# Altium PCB MiniPC.PcbDoc (part 3 of 24)
Units mm, origin at the board's own origin, x right, y up, seen from the top; angles counter-clockwise.
Board outline 175 x 155 mm, 16 copper layers (1_Top, 2_int1_(gnd), 3_int2_(power), 4_int3_(gnd), 5_int4_(sign), 6_int5_(power), 7_int6_(sign), 8_int7_(power), 9_int8_(gnd), 10_int9_(sign), 11_int10_(gnd), 12_int11_(sign), 13_int12_(gnd), 14_int13_(power), 15_int14_(gnd), 16_Bottom), stack 2.008 mm thick; 1046 components, 837 nets, 6010 pads, 4009 vias.
Unrouted connection lines stored in the file: 564.
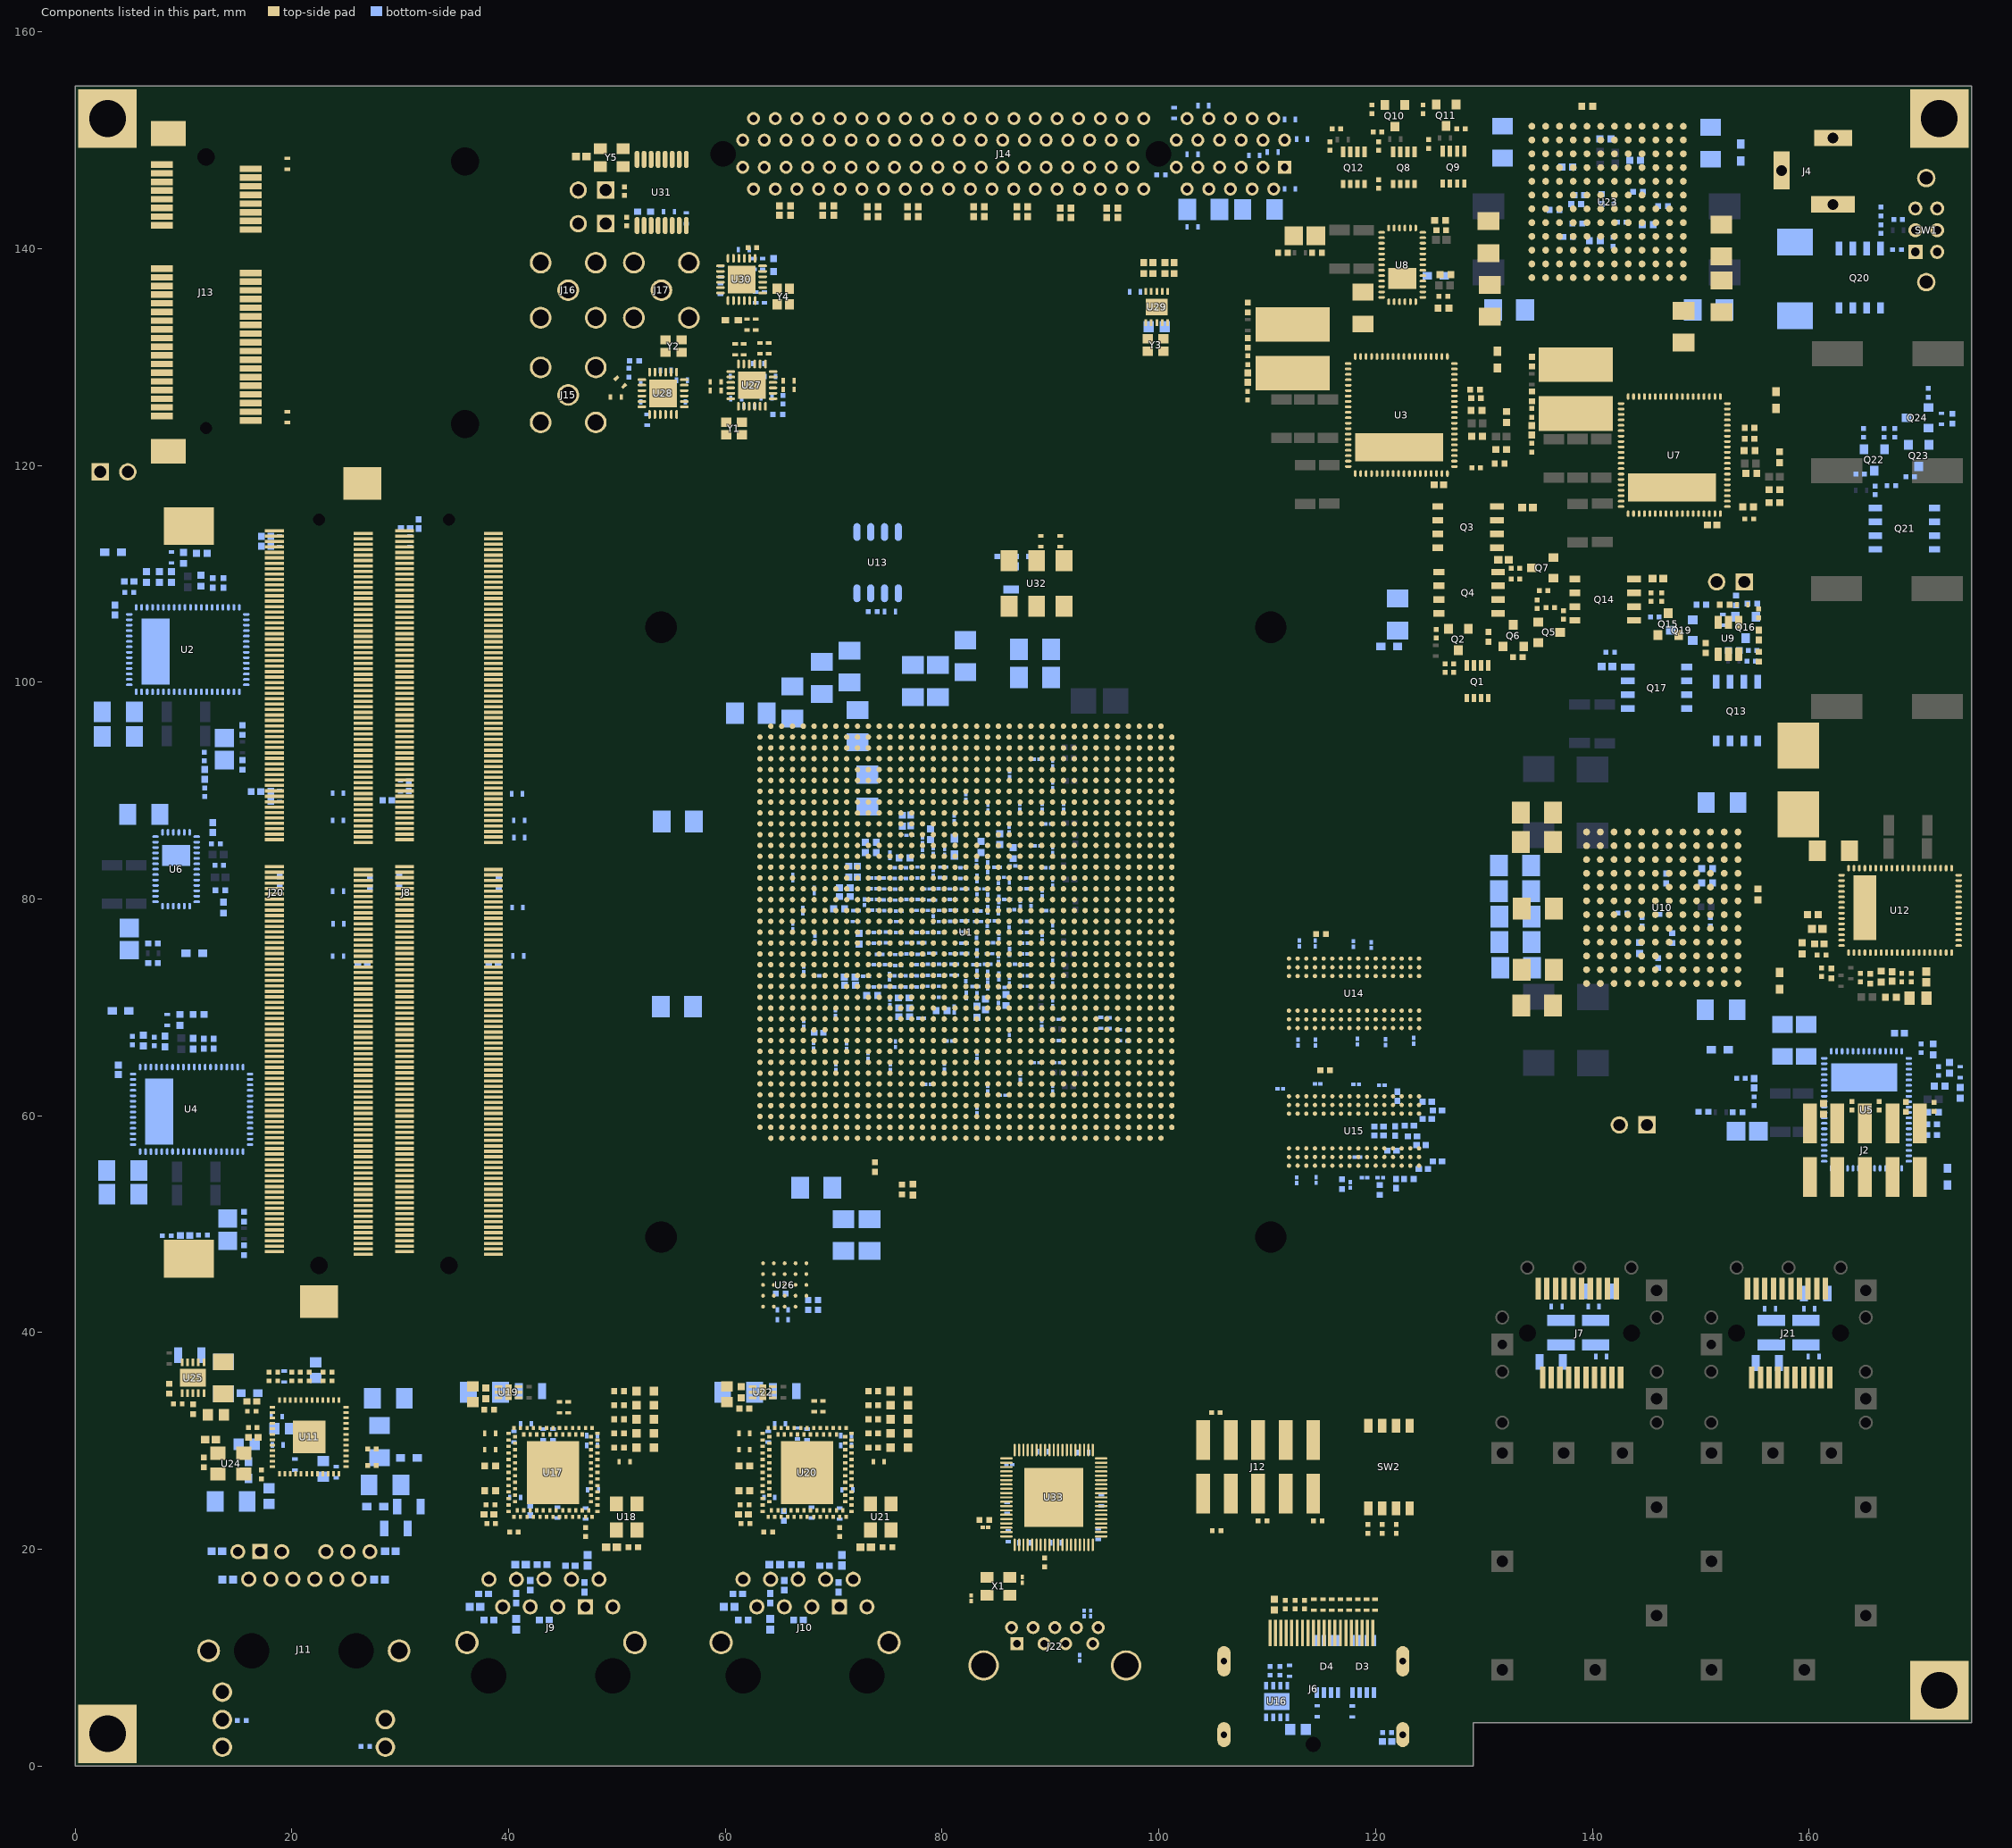
[diagram p17: the components of this part, seen from the top]

## Components (designator, comment, footprint, x,y, rotation, side; value= is the part's Value field where it differs from the comment) (continued)
C491 "GRM155R61A224KE19D" CAPC1005X55X25NL05T10 82.9,143.4 r90 top
C492 "GRM155R61A224KE19D" CAPC1005X55X25NL05T10 77.8,143.4 r90 top
C493 "GRM155R61A224KE19D" CAPC1005X55X25NL05T10 76.8,143.4 r90 top
C494 "GRM155R61A224KE19D" CAPC1005X55X25NL05T10 74.1,143.4 r90 top
C495 "GRM155R61A224KE19D" CAPC1005X55X25NL05T10 73.1,143.4 r90 top
C496 "GRM155R61A224KE19D" CAPC1005X55X25NL05T10 70,143.5 r90 top
C497 "GRM155R61A224KE19D" CAPC1005X55X25NL05T10 69,143.5 r90 top
C498 "GRM155R61A224KE19D" CAPC1005X55X25NL05T10 66,143.5 r90 top
C499 "GRM155R61A224KE19D" CAPC1005X55X25NL05T10 65,143.5 r90 top
C500 "GRM31CR61E226KE15L" CAPC3216X180X55ML20T25 109.2,143.6 r0 bottom locked
C501 "C1005X7R1E104M" CAPC1005X55X10LL05 108.8,148.6 r0 bottom locked
C502 "C1005X7R1E104M" CAPC1005X55X10LL05 110.5,148.9 r180 bottom locked
C503 "C1005X7R1E104M" CAPC1005X55X10LL05 113.2,150.1 r180 bottom locked
C504 "C1005X7R1E104M" CAPC1005X55X10LL05 112.1,145.5 r180 bottom locked
C505 "C1005X7R1E104M" CAPC1005X55X10LL05 112.1,151.9 r180 bottom locked
C506 "C1005X7R1E104M" CAPC1005X55X10LL05 104.1,153.2 r0 bottom locked
C507 "C1005X7R1E104M" CAPC1005X55X10LL05 103.1,148.7 r0 bottom locked
C508 "C1005X7R1E104M" CAPC1005X55X10LL05 103.1,142 r180 bottom locked
C509 "GRM31CR60J107ME39L" CAPC3216X190X55ML30T25 104.1,143.6 r180 bottom locked
C510 "C1005X7R1E104M" CAPC1005X55X10LL05 64.15,128.2 r180 bottom locked
C511 "C1005X7R1E104M" CAPC1005X55X10LL05 63.8,126.25 r180 bottom locked
C512 "C1005X7R1E104M" CAPC1005X55X10LL05 63.05,129.4 r0 bottom locked
C513 "C1005X7R1E104M" CAPC1005X55X10LL05 60.95,128.2 r0 bottom locked
C514 "C1005X7R1E104M" CAPC1005X55X10LL05 61,126.15 r0 bottom locked
C515 "C1005X7R1E104M" CAPC1005X55X10LL05 62.2,125.45 r180 bottom locked
C516 "C1005X7R1E104M" CAPC1005X55X10LL05 59.1,126.9 r180 top
C517 "C1005X7R1E104M" CAPC1005X55X10LL05 59.1,127.7 r180 top
C518 "C1005X7R1E104M" CAPC1005X55X10LL05 60.9,130.7 r90 top
C519 "C1005X7R1E104M" CAPC1005X55X10LL05 61.7,130.7 r90 top
C520 "C1005X7R1E104M" CAPC1005X55X10LL05 63.2,130.8 r90 top
C521 "C1005X7R1E104M" CAPC1005X55X10LL05 64,130.8 r90 top
C522 "C1005X7R1E104M" CAPC1005X55X10LL05 65.85,127.8 r0 top
C523 "C1005X7R1E104M" CAPC1005X55X10LL05 65.85,127 r0 top
C524 "C1005X7R1E104M" CAPC1005X55X10LL05 49.9,126.3 r180 top
C525 "C1005X7R1E104M" CAPC1005X55X10LL05 52.8,124.2 r270 bottom locked
C526 "C1005X7R1E104M" CAPC1005X55X10LL05 55.8,125.85 r180 bottom locked
C527 "C1005X7R1E104M" CAPC1005X55X10LL05 56,127.85 r180 bottom locked
C528 "C1005X7R1E104M" CAPC1005X55X10LL05 54.5,128.75 r0 bottom locked
C529 "C1005X7R1E104M" CAPC1005X55X10LL05 52.7,127.55 r0 bottom locked
C530 "C1005X7R1E104M" CAPC1005X55X10LL05 52.7,125.85 r0 bottom locked
C531 "C1005X7R1E104M" CAPC1005X55X10LL05 50.3,127.675 r135 top
C532 "C1005X7R1E104M" CAPC1005X55X10LL05 62.645,138.575 r90 bottom locked
C533 "C1005X7R1E104M" CAPC1005X55X10LL05 62.8,135.5 r270 bottom locked
C534 "C1005X7R1E104M" CAPC1005X55X10LL05 63.445,138.575 r90 bottom locked
C535 "C1005X7R1E104M" CAPC1005X55X10LL05 59.6,137.9 r270 bottom locked
C536 "C1005X7R1E104M" CAPC1005X55X10LL05 63.6,135.5 r270 bottom locked
C537 "C1005X7R1E104M" CAPC1005X55X10LL05 61.7,139.9 r180 bottom locked
C538 "C1005X7R1E104M" CAPC1005X55X10LL05 59.545,136.275 r90 bottom locked
C539 "C1005X7R1E104M" CAPC1005X55X10LL05 62,133 r90 top
C540 "C1005X7R1E104M" CAPC1005X55X10LL05 62.8,133 r90 top
C541 "C1005X7R1E104M" CAPC1005X55X10LL05 97.8,136 r0 bottom locked
C542 "GRM188R61A225KE34x" CAPC1608X90X35ML10T15 99.8,132.8 r180 bottom locked
C543 "GRM155R71H103KA88D" CAPC1005X55X25ML05T10 46.7,148.5 r0 top
C544 "C1005X7R1E104M" CAPC1005X55X10LL05 90.9,113 r270 top
C545 "C1005X7R1E104M" CAPC1005X55X10LL05 89.1,113 r270 top
C546 "C1005X7R1E104M" CAPC1005X55X10LL05 56.4,142.8 r270 bottom locked
C547 "C1005X7R1E104M" CAPC1005X55X10LL05 54.8,143.4 r180 bottom locked
C548 "C1005X7R1E104M" CAPC1005X55X10LL05 87.41,111.6 r180 bottom locked
C549 "C2012X5R1C106K085AC" CAPC2013X100X20NL20 86.36,109.625 r90 bottom locked
C550 "C1005X7R1E104M" CAPC1005X55X10LL05 136.7,42.4 r0 bottom locked
C551 "C1005X7R1E104M" CAPC1005X55X10LL05 140.8,37.8 r180 bottom locked
C552 "C2012X5R1C106K085AC" CAPC2013X100X20NL20 136.2,37.3 r0 bottom locked
C553 "C1005X7R1E104M" CAPC1005X55X10LL05 140.1,42.4 r180 bottom locked
C554 "C2012X5R1C106K085AC" CAPC2013X100X20NL20 140.5,43.8 r180 bottom locked
C555 "C1005X7R1E104M" CAPC1005X55X10LL05 160.4,37.8 r180 bottom locked
C556 "C1005X7R1E104M" CAPC1005X55X10LL05 156.4,42.2 r0 bottom locked
C557 "C2012X5R1C106K085AC" CAPC2013X100X20NL20 156.125,37.2 r0 bottom locked
C558 "C1005X7R1E104M" CAPC1005X55X10LL05 160,42.2 r180 bottom locked
C559 "C2012X5R1C106K085AC" CAPC2013X100X20NL20 160.6,43.6 r180 bottom locked
C560 "GRM033R60J104KE19D" CAPC0603X33X15LL03T05 93.7,14.095 r270 bottom locked
C561 "GRM033R60J104KE19D" CAPC0603X33X15LL03T05 93.1,14.095 r270 bottom locked
C562 "GRM033R60J104KE19D" CAPC0603X33X15LL03T05 92.7,10 r90 bottom locked
C563 "GRM033R60J104KE19D" CAPC0603X33X15LL03T05 84,22.025 r0 top
C564 "GRM033R60J104KE19D" CAPC0603X33X15LL03T05 82.675,15.5 r90 top
C565 "GRM033R60J104KE19D" CAPC0603X33X15LL03T05 87.4,17.2 r90 top
C566 "C1005X7R1E104M" CAPC1005X55X10LL05 86.1,21.225 r270 bottom locked
C567 "C1005X7R1E104M" CAPC1005X55X10LL05 90.5,20.625 r180 bottom locked
C568 "C1005X7R1E104M" CAPC1005X55X10LL05 87.6,20.625 r0 bottom locked
C569 "GRM033R60J104KE19D" CAPC0603X33X15LL03T05 86.2,27.825 r0 bottom locked
C570 "C1005X7R1E104M" CAPC1005X55X10LL05 89.3,29.025 r0 bottom locked
C571 "C1005X7R1E104M" CAPC1005X55X10LL05 86,23.825 r270 bottom locked
C572 "C1005X7R1E104M" CAPC1005X55X10LL05 93,28.925 r0 bottom locked
C573 "C1005X7R1E104M" CAPC1005X55X10LL05 94.7,24.525 r90 bottom locked
C574 "C1005X7R1E104M" CAPC1005X55X10LL05 94.4,21.425 r270 bottom locked
D1 "B530C-13-F" DIOD-SMC-2_V 158.7,137.2 r90 bottom locked
D3 "82401646" MSOP-8L 118.85,9.2 r270 bottom locked
D4 "82401646" MSOP-8L 115.55,9.2 r270 bottom locked
D5 "150060VS75000" 0603_A 52.6,29.4 r0 top
D6 "150060VS75000" 0603_A 52.6,30.7 r0 top
D7 "150060VS75000" 0603_A 52.6,32 r0 top
D8 "150060VS75000" 0603_A 52.6,33.3 r0 top
D9 "150060VS75000" 0603_A 52.6,34.6 r0 top
D10 "150060VS75000" 0603_A 76.05,29.4 r0 top
D11 "150060VS75000" 0603_A 76.05,30.7 r0 top
D12 "150060VS75000" 0603_A 76.05,32 r0 top
D13 "150060VS75000" 0603_A 76.05,33.3 r0 top
D14 "150060VS75000" 0603_A 76.05,34.6 r0 top
F1 "154001" LFUS-0154001.DR_V 159,90.98 r90 top
J1 "613 002 111 21" WE-61300211121_V 3.6,119.4 r0 bottom locked
J2 "TSM-105-01-T-DV-TR" SMTC-TSM-105-01-T-DV_V 165.135,56.83 r0 top
J3 "613 002 111 21" WE-61300211121_V 152.735,109.25 r180 top locked
J4 "16PJ032" KOBI-16PJ032_V 162.2,150.2 r90 top locked
J5 "613 002 111 21" WE-61300211121_V 143.75,59.16 r180 top
J6 "472720024" MOLX-472720024_V 114.25,7.15 r0 top locked
J7 "MECT-110-01-M-D-RA1" SMTC-MECT-110-01-M-D-RA1_V 138.8,39.95 r0 top locked
J8 "AS0A823-H8SB-7H" FOXC-AS0A823-H8SB-7H_V 34.5,80.6 r90 top locked
J9 "7499111001A" WE-7499111001A_V 43.9,12.8 r180 top locked
J10 "7499111001A" WE-7499111001A_V 67.35,12.8 r180 top locked
J11 "L829-1J1T-43" BELS-L829-1J1T-43_V 21.112,10.65 r180 top locked
J12 "TSM-105-01-T-DV-TR" SMTC-TSM-105-01-T-DV_V 109.16,27.625 r0 top
J13 "292443-1" BTB-SM0-8-2H52F 12.1,135.95 r270 top locked
J14 "PCIE-098-02-F-D-TH" SMTC-PCIE-098-02-F-D-TH_V 86.583,148.75 r0 top locked
J15 "LTI-SASF54GT" LHT-LTI-SASF54GT_V 45.5,126.5 r90 top locked
J16 "LTI-SASF54GT" LHT-LTI-SASF54GT_V 45.5,136.16 r90 top locked
J17 "LTI-SASF54GT" LHT-LTI-SASF54GT_V 54.1,136.16 r180 top locked
J18 "613 002 111 21" WE-61300211121_V 47.7,142.3 r180 top locked
J19 "613 002 111 21" WE-61300211121_V 47.7,145.4 r180 top locked
J20 "AS0A823-H4SB-7H" FOXC-AS0A823-H4SB-7H_V 22.5,80.6 r90 top locked
J21 "MECT-110-01-M-D-RA1" SMTC-MECT-110-01-M-D-RA1_V 158.1,39.95 r0 top locked
J22 "10117835" FCI-10117835_V 90.4,11.045 r0 top locked
L1 "742792609" SMD-0603 3.5,112 r0 bottom locked
L2 "742792609" SMD-0603 131.24,129.76 r270 top
L3 "742792609" SMD-0603 4.2,69.7 r0 bottom locked
L4 "742792609" SMD-0603 172.76,54.38 r270 bottom locked
L5 "742792609" SMD-0603 11,75 r0 bottom locked
L6 "742792609" SMD-0603 156.95,126.025 r270 top
L7 "742792609" SMD-0603 125.55,137.5 r0 bottom locked
L8 "742792609" SMD-0603 151.75,66.1 r180 bottom locked
L9 "742792609" SMD-0603 153.67,148.86 r270 bottom
L10 "742792609" SMD-0603 157.28,72.46 r270 top
L11 "742792609" SMD-0603 15.997,27.325 r270 bottom locked value=30Ohm
L12 "742792609" SMD-0603 27.7,23.95 r180 bottom locked value=30Ohm
L13 "742792609" SMD-0603 16.097,34.425 r0 bottom locked value=30Ohm
L14 "742792609" SMD-0603 30.8,28.45 r180 bottom locked value=30Ohm
L15 "742792609" SMD-0603 121.25,103.3 r180 bottom locked
L16 "742792609" SMD-0603 81.15,84.825 r270 bottom locked
L17 "BLM15AG221SN1J" MURA-BLM15-CHIP-2_V 64.85,124.7 r0 bottom locked
L18 "BLM15AG221SN1x" MURA-BLM15AG221SN1x_V 51.6,129.65 r180 bottom locked
L19 "742792780" SMD-0402 64.445,138.475 r270 bottom locked
L20 "742792780" SMD-0402 60.6,133.4 r0 top
L21 "742792780" SMD-0402 52.5,143.4 r180 bottom locked
L22 "BLM15AG221SN1x" MURA-BLM15AG221SN1x_V 85.539,111.6 r180 bottom locked
L23 "1008CS-102XFLC" COIL-1008CS_V 137.1,40 r0 bottom locked
L24 "1008CS-102XFLC" COIL-1008CS_V 140.3,40 r0 bottom locked
L25 "1008CS-102XFLC" COIL-1008CS_V 156.5,40 r0 bottom locked
L26 "1008CS-102XFLC" COIL-1008CS_V 159.7,40 r0 bottom locked
M1 "Full Fan Mini" "FULL FAN MINI" 82.1,77.1 r0 top
MH1 "Comment" "Mounting Hole" 172,152 r0 top locked
MH2 "Comment" "Mounting Hole" 3,152 r0 top locked
MH3 "Comment" "Mounting Hole" 3,3 r0 top locked
MH4 "Comment" "Mounting Hole" 172,7 r0 top locked
Q1 "SiSS23DN-T1-GE3" VISH-PPAK1212-8S_V 129.4,100.1 r270 top locked
Q2 "DMG2305UX-7" DIOD-SOT23-3_A_V 127.63,103.94 r270 top
Q3 "SiRA00DP-T1-GE3" VISH-PPAKSO-8_V 128.468,114.305 r180 top locked
Q4 "SiRA00DP-T1-GE3" VISH-PPAKSO-8_V 128.56,108.25 r180 top locked
Q5 "MMBT2222A-7-F" DIOD-SOT23-3_V 136.01,104.6 r0 top
Q6 "MMBT2222A-7-F" DIOD-SOT23-3_V 132.7,104.3 r90 top
Q7 "MMBT2222A-7-F" DIOD-SOT23-3_V 135.4,110.55 r180 top
Q8 "SiSS23DN-T1-GE3" VISH-PPAK1212-8S_V 122.6,147.5 r270 top locked
Q9 "SiSS23DN-T1-GE3" VISH-PPAK1212-8S_V 127.19,147.55 r270 top locked
Q10 "DMG2305UX-7" DIOD-SOT23-3_A_V 121.77,152.25 r270 top
Q11 "DMG2305UX-7" DIOD-SOT23-3_A_V 126.5,152.3 r270 top
Q12 "SiSS23DN-T1-GE3" VISH-PPAK1212-8S_V 118,147.5 r270 top locked
Q13 "Si7635DP-T1-GE3" VISH-PPAKSO-8_V 153.33,97.318 r270 bottom locked
Q14 "SiRA00DP-T1-GE3" VISH-PPAKSO-8_V 141.113,107.615 r180 top locked
Q15 "MMBT2222A-7-F" DIOD-SOT23-3_V 146.995,105.35 r90 top
Q16 "MMBT2222A-7-F" DIOD-SOT23-3_V 154.145,105.05 r270 bottom
Q17 "SiRA00DP-T1-GE3" VISH-PPAKSO-8_V 145.978,99.485 r0 bottom locked
Q19 "MMBT2222A-7-F" DIOD-SOT23-3_V 148.245,104.8 r180 bottom
Q20 "Si7635DP-T1-GE3" VISH-PPAKSO-8_V 164.665,137.268 r270 bottom locked
Q21 "Si7635DP-T1-GE3" VISH-PPAKSO-8_V 168.832,114.165 r0 bottom locked
Q22 "DMP3098L-7" DIOD-SOT23-3_V 166,120.5 r270 bottom locked
Q23 "MMBT2222A-7-F" DIOD-SOT23-3_V 170.1,120.9 r270 bottom locked
Q24 "MMBT2222A-7-F" DIOD-SOT23-3_V 170,124.4 r180 bottom
R1 "ERJ-2RKF10R0X" RESC1005X40X25LL05T05 125.59,104.47 r270 top
R2 "ERJ-2RKF10R0X" RESC1005X40X25LL05T05 126.8,101.7 r0 top
R3 "ERJ-2RKF4992X" RESC1005X40X25LL05T05 126.8,100.9 r180 top
R4 "ERJ-2RKF1003X" RESC1005X40X25LL05T05 134.91,107.2 r90 top
R5 "ERJ-2RKF1003X" RESC1005X40X25LL05T05 136.11,106.9 r180 top
R6 "ERJ-2RKF1001X" RESC1005X40X25LL05T05 137.31,106.2 r90 top
R7 "ERJ-2RKF1002X" RESC1005X40X25NL05T05 130.41,104.18 r90 top
R8 "ERJ-2RKF1003X" RESC1005X40X25LL05T05 132.9,109.5 r0 top
R9 "ERJ-2RKF1002X" RESC1005X40X25NL05T05 133.11,102.31 r180 top
R10 "ERJ-2RKF1003X" RESC1005X40X25LL05T05 135.5,108.45 r180 top
R11 "ERJ-2RKF1001X" RESC1005X40X25LL05T05 132.9,110.5 r180 top
R12 "ERJ-2RKF10R0X" RESC1005X40X25LL05T05 119.67,152.85 r270 top
R13 "ERJ-2RKF10R0X" RESC1005X40X25LL05T05 124.37,152.85 r270 top
R14 "ERJ-2RKF10R0X" RESC1005X40X25LL05T05 120.27,149.45 r270 top
R15 "ERJ-2RKF10R0X" RESC1005X40X25LL05T05 124.87,149.65 r270 top
R16 "ERJ-2RKF1003X" RESC1005X40X25LL05T05 120.17,150.75 r0 top
R17 "ERJ-2RKF1003X" RESC1005X40X25LL05T05 127.87,151.05 r180 top
R18 "ERJ-2RKF1003X" RESC1005X40X25LL05T05 120.27,145.95 r90 top
R19 "ERJ-2RKF10R0X" RESC1005X40X25LL05T05 115.77,149.45 r270 top
R20 "ERJ-2RKF1003X" RESC1005X40X25LL05T05 116.37,151.05 r0 top
R21 "ERJ-2RKF3243X" RESC1005X40X25ML05T05 7.8,109.7 r270 bottom locked
R22 "ERJ-2RKF1502X" RESC1005X40X25ML05T05 8.9,109.7 r270 bottom locked
R23 "ERJ-2RKF1002X" RESC1005X40X25NL05T05 15.44,95.58 r90 bottom
R24 "CRCW0402160KFKED" RESC1005X40X25ML05T05 10,111.46 r270 bottom locked
R25 "ERJ-2RKF1002X" RESC1005X40X25NL05T05 15.44,92.37 r270 bottom
R26 "ERJ-2GE0R00X" RESC1005X40X25ML05T05 11.7,111.9 r180 bottom locked
R27 "WSLP12061L000FEA" RESC3216X89X104LL25T25 13.78,93.84 r90 bottom
R28 "ERJ-2RKF1000X" RESC1005X40X25LL05T05 11.94,93.14 r270 bottom
R29 "ERJ-2GE0R00X" RESC1005X40X25ML05T05 11.6,109.36 r90 bottom locked
R30 "ERJ-2RKF1000X" RESC1005X40X25LL05T05 11.96,89.85 r90 bottom
R31 "NRC04F49R9TRF" RESC1005X35X25NL8T10 5,109.3 r180 bottom locked
R32 "CRCW04021M78FKED" RESC1005X40X25ML05T05 6.6,109.7 r270 bottom locked
R33 "ERJ-2RKF1002X" RESC1005X40X25NL05T05 13.7,109.16 r270 bottom locked
R34 "ERJ-2RKF1003X" RESC1005X40X25LL05T05 5,108.3 r180 bottom locked
R35 "CRCW04023K57FKED" RESC1005X40X25NL05T05 12.7,109.16 r90 bottom locked
R36 "ERJ-2RKF2263X" RESC1005X40X25NL05T05 131.44,120.17 r0 top
R37 "ERJ-2RKF1202X" RESC1005X40X25ML05T05 131.59,121.47 r180 top
R38 "ERJ-2RKF1000X" RESC1005X40X25LL05T05 108.2,129.71 r270 top
R39 "CRCW0402160KFKED" RESC1005X40X25ML05T05 129.365,122.67 r180 top
R40 "ERJ-2RKF1000X" RESC1005X40X25LL05T05 108.18,126.42 r90 top
R41 "ERJ-2GE0R00X" RESC1005X40X25ML05T05 132.065,124.47 r270 top
R42 "CSS2725FTL250" STAC-CSS2725-099H_V 112.34,130.76 r270 top
R43 "ERJ-2GE0R00X" RESC1005X40X25ML05T05 129.295,125.06 r0 top
R44 "ERJ-2RKF1002X" RESC1005X40X25NL05T05 108.21,134.56 r90 top
R45 "ERJ-2RKF1002X" RESC1005X40X25NL05T05 108.21,131.3 r270 top
R46 "ERJ-2RKF1002X" RESC1005X40X25NL05T05 129.165,126.995 r180 top
R47 "ERJ-2RKF1003X" RESC1005X40X25LL05T05 129.265,119.795 r0 top
R48 "CRCW04023K57FKED" RESC1005X40X25NL05T05 129.265,126.195 r0 top
R49 "CRCW0402191KFKED" RESC1005X40X25LL05T05 7.295,66.85 r270 bottom locked
R50 "ERJ-2RKF1502X" RESC1005X40X25ML05T05 8.295,66.85 r270 bottom locked
R51 "ERJ-2RKF1002X" RESC1005X40X25NL05T05 15.6,50.68 r90 bottom
R52 "CRCW0402160KFKED" RESC1005X40X25ML05T05 9.695,68.85 r270 bottom locked
R53 "ERJ-2RKF1002X" RESC1005X40X25NL05T05 15.59,47.61 r270 bottom
R54 "ERJ-2GE0R00X" RESC1005X40X25ML05T05 11.395,69.35 r180 bottom locked
R55 "WSLP12061L000FEA" RESC3216X89X104LL25T25 14.08,49.49 r90 bottom
R56 "ERJ-2RKF1000X" RESC1005X40X25LL05T05 11.8,49 r180 bottom
R57 "ERJ-2GE0R00X" RESC1005X40X25ML05T05 10.895,66.65 r90 bottom locked
R58 "ERJ-2RKF1000X" RESC1005X40X25LL05T05 8.46,48.94 r0 bottom
R59 "ERJ-2GE0R00X" RESC1005X40X25ML05T05 6.295,66.95 r90 bottom locked
R60 "ERJ-2RKF1002X" RESC1005X40X25NL05T05 12.795,66.65 r270 bottom locked
R61 "ERJ-2RKF1003X" RESC1005X40X25LL05T05 5.295,66.95 r90 bottom locked
R62 "ERJ-2RKF5491X" RESC1005X40X25NL05T05 11.895,66.65 r90 bottom locked
R63 "CRCW0402191KFKED" RESC1005X40X25LL05T05 171.935,64.13 r270 bottom locked
R64 "ERJ-2RKF1502X" RESC1005X40X25ML05T05 172.935,64.43 r270 bottom locked
R65 "ERJ-2RKF1002X" RESC1005X40X25NL05T05 153.4,60.34 r0 bottom
R66 "CRCW0402160KFKED" RESC1005X40X25ML05T05 172.035,62.73 r180 bottom locked
R67 "ERJ-2RKF1002X" RESC1005X40X25NL05T05 150.24,60.36 r180 bottom
R68 "ERJ-2GE0R00X" RESC1005X40X25ML05T05 173.935,62.13 r90 bottom locked
R69 "WSLP12061L000FEA" RESC3216X89X104LL25T25 154.28,58.58 r0 bottom
R70 "ERJ-2RKF1000X" RESC1005X40X25LL05T05 154.9,61.35 r90 bottom
R71 "ERJ-2GE0R00X" RESC1005X40X25ML05T05 171.435,60.33 r0 bottom locked
R72 "ERJ-2RKF1000X" RESC1005X40X25LL05T05 153.7,63.45 r0 bottom
R73 "CRCW0402976KFKED" RESC1005X40X25ML05T05 161.335,60.63 r90 top
R74 "ERJ-2GE0R00X" RESC1005X40X25ML05T05 171.435,66.13 r90 bottom locked
R75 "ERJ-2RKF1002X" RESC1005X40X25NL05T05 171.335,58.23 r180 bottom locked
R76 "CRCW0402649KFKED" RESC1005X40X25LL05T05 163.935,60.93 r90 top
R77 "ERJ-2RKF1003X" RESC1005X40X25LL05T05 170.335,66.23 r90 bottom locked
R78 "CRCW0402390KFKED" RESC1005X40X25LL05T05 166.435,60.93 r90 top
R79 "ERJ-2RKF5491X" RESC1005X40X25NL05T05 171.335,59.23 r0 bottom locked
R80 "ERJ-2RKF2403X" RESC1005X40X25NL05T05 168.935,60.83 r90 top
R81 "CRCW0402137KFKED" RESC1005X40X25LL05T05 171.535,60.83 r90 top
R82 "ERJ-2RKF1002X" RESC1005X40X25NL05T05 7.2,74.1 r180 bottom locked
R83 "WSLP12061L000FEA" RESC3216X89X104LL25T25 5,76.3 r90 bottom locked
R84 "ERJ-2RKF1002X" RESC1005X40X25NL05T05 7.2,75.9 r0 bottom locked
R85 "ERJ-2GE0R00X" RESC1005X40X25ML05T05 13.7,79.2 r90 bottom locked
R86 "ERJ-2RKF2003X" RESC1005X40X25NL05T05 13.4,80.8 r0 bottom locked
R87 "NRC04F49R9TRF" RESC1005X35X25NL8T10 12.7,86.6 r270 bottom locked
R88 "ERJ-2RKF1004X" RESC1005X40X25LL05T05 13.3,83.1 r180 bottom locked
R89 "ERJ-2RKF1003X" RESC1005X40X25LL05T05 13,85.1 r180 bottom locked
R90 "ERJ-2RKF8062X" RESC1005X40X25ML05T05 156.795,116.56 r0 top
R91 "ERJ-2RKF1502X" RESC1005X40X25ML05T05 156.795,117.76 r180 top
R92 "ERJ-2RKF1000X" RESC1005X40X25LL05T05 134.41,124.85 r270 top
R93 "CRCW0402160KFKED" RESC1005X40X25ML05T05 154.67,119.26 r180 top
R94 "ERJ-2RKF1000X" RESC1005X40X25LL05T05 134.41,121.63 r90 top
R95 "ERJ-2GE0R00X" RESC1005X40X25ML05T05 157.27,120.76 r270 top
R96 "CSS2725FTL250" STAC-CSS2725-099H_V 138.47,127.03 r270 top
R97 "ERJ-2GE0R00X" RESC1005X40X25ML05T05 154.5,121.35 r0 top
R98 "ERJ-2RKF1002X" RESC1005X40X25NL05T05 134.43,129.57 r90 top
R99 "ERJ-2RKF1002X" RESC1005X40X25NL05T05 134.42,126.37 r270 top
R100 "ERJ-2GE0R00X" RESC1005X40X25ML05T05 154.37,116.16 r180 top
R101 "ERJ-2RKF1002X" RESC1005X40X25NL05T05 154.495,123.46 r180 top
R102 "ERJ-2RKF1003X" RESC1005X40X25LL05T05 154.47,115.06 r0 top
R103 "ERJ-2RKF5491X" RESC1005X40X25NL05T05 154.495,122.46 r0 top
R104 "ERJ-2RKF1002X" RESC1005X40X25NL05T05 111.44,139.61 r180 top
R105 "WSLP12061L000FEA" RESC3216X89X104LL25T25 113.46,141.18 r180 top
R106 "ERJ-2RKF1002X" RESC1005X40X25NL05T05 114.58,139.61 r0 top
R107 "ERJ-2GE0R00X" RESC1005X40X25ML05T05 125.95,142.6 r0 top
R108 "ERJ-2RKF2003X" RESC1005X40X25NL05T05 126.05,141.7 r0 top
R109 "ERJ-2GE0R00X" RESC1005X40X25ML05T05 126.25,134.5 r180 top
R110 "ERJ-2RKF8662X" RESC1005X40X25ML05T05 126.45,137.6 r180 top
R111 "ERJ-2RKF1003X" RESC1005X40X25LL05T05 126.25,135.6 r180 top
R112 "CMP-2002-00967" RESC1005X40X25ML05T05 153.06,102.93 r180 bottom
R113 "ERJ-2RKF2552x" RESC1005X40X25NL05T05 155.345,102.35 r270 top
R114 "ERJ-2RKF10R0X" RESC1005X40X25LL05T05 154.65,101.94 r0 bottom
R115 "ERJ-2RKF1003X" RESC1005X40X25LL05T05 145.395,107.85 r270 top
R116 "ERJ-2RKF1003X" RESC1005X40X25LL05T05 154.78,102.91 r180 bottom
R117 "ERJ-2RKF1001X" RESC1005X40X25LL05T05 146.395,107.85 r90 top
R118 "ERJ-2RKF1002X" RESC1005X40X25NL05T05 153.245,107.55 r90 bottom locked
R119 "ERJ-2RKF1002X" RESC1005X40X25NL05T05 154.745,107.25 r180 bottom locked
R120 "NRC04F49R9TRF" RESC1005X35X25NL8T10 155.345,104.35 r270 top
R121 "ERJ-2RKF1001X" RESC1005X40X25LL05T05 155.345,106.35 r270 top
R122 "ERJ-2RKF1002X" RESC1005X40X25NL05T05 150.445,103.15 r270 top
R123 "ERJ-2RKF1002X" RESC1005X40X25NL05T05 152.195,107.15 r180 top
R124 "ERJ-2RKF1003X" RESC1005X40X25LL05T05 145.745,106 r0 bottom locked
R125 "ERJ-2RKF1003X" RESC1005X40X25LL05T05 141.645,102.75 r180 bottom locked
R127 "ERJ-2RKF1002X" RESC1005X40X25NL05T05 150.045,107.15 r0 bottom locked
R128 "ERJ-2RKF10R0X" RESC1005X40X25LL05T05 168.1,139.9 r180 bottom locked
R129 "ERJ-2RKF4992X" RESC1005X40X25LL05T05 168.2,142.7 r180 bottom locked
R130 "ERJ-2RKF10R0X" RESC1005X40X25LL05T05 166.6,141.8 r270 bottom locked
R131 "ERJ-2RKF1003X" RESC1005X40X25LL05T05 166.6,143.418 r270 bottom locked
R132 "ERJ-2RKF4992X" RESC1005X40X25LL05T05 166.9,123 r90 bottom locked
R133 "ERJ-2RKF4992X" RESC1005X40X25LL05T05 167.9,123 r90 bottom locked
R134 "ERJ-2RKF4992X" RESC1005X40X25LL05T05 165,123 r90 bottom locked
R135 "ERJ-2RKF10R0X" RESC1005X40X25LL05T05 164.7,119.2 r180 bottom locked
R136 "ERJ-2RKF10R0X" RESC1005X40X25LL05T05 166.1,117.7 r270 bottom locked
R137 "ERJ-2RKF1003X" RESC1005X40X25LL05T05 167.575,118.125 r180 bottom
R138 "ERJ-2RKF1001X" RESC1005X40X25LL05T05 169.325,118.95 r180 bottom locked
R139 "ERJ-2RKF1001X" RESC1005X40X25LL05T05 171,126.7 r270 bottom locked
R140 "ERJ-2RKF1002X" RESC1005X40X25NL05T05 173.2,124.3 r90 bottom locked
R141 "ERJ-2GE0R00X" RESC1005X40X25ML05T05 155.26,80.43 r90 top
R142 "ERJ-2GE0R00X" RESC1005X40X25ML05T05 150.59,82.795 r0 bottom locked
R143 "ERJ-2GE0R00X" RESC1005X40X25ML05T05 150.59,81.495 r0 bottom locked
R147 "ERJ-2RKF1002X" RESC1005X40X25NL05T05 146.79,81.895 r90 bottom locked
R148 "ERJ-2RKF1002X" RESC1005X40X25NL05T05 147.365,76.395 r270 bottom locked
R149 "ERJ-2GE0R00X" RESC1005X40X25ML05T05 144.36,75.485 r270 bottom locked
R150 "ERJ-2RKF1651X" RESC1005X40X25LL05T05 142.765,78.695 r0 bottom locked
R151 "ERJ-2RKF1002X" RESC1005X40X25NL05T05 146.06,74.085 r270 bottom locked
R152 "ERJ-2RKF1782X" RESC1005X40X25LL05T05 150.89,77.895 r90 bottom locked
R153 "ERJ-2RKF1651X" RESC1005X40X25LL05T05 144.565,77.895 r270 bottom locked
R154 "ERJ-2RKF1651X" RESC1005X40X25LL05T05 146.64,78.595 r0 bottom locked
R155 "ERJ-2GE0R00X" RESC1005X40X25ML05T05 139.52,153.12 r180 top
R156 "ERJ-2GE0R00X" RESC1005X40X25ML05T05 143.938,148.138 r0 bottom locked
R157 "ERJ-2GE0R00X" RESC1005X40X25ML05T05 137.68,147.52 r180 bottom locked
R158 "ERJ-2RKF1002X" RESC1005X40X25NL05T05 137.75,141.075 r180 bottom locked
R159 "ERJ-2RKF1002X" RESC1005X40X25NL05T05 138.5,144.1 r180 bottom locked
R160 "ERJ-2RKF1002X" RESC1005X40X25NL05T05 136.5,143.575 r180 bottom locked
R161 "ERJ-2RKF1002X" RESC1005X40X25NL05T05 138.6,142.3 r180 bottom locked
R162 "ERJ-2RKF1002X" RESC1005X40X25NL05T05 140.85,144.575 r90 bottom locked
R163 "ERJ-2GE0R00X" RESC1005X40X25ML05T05 140.22,140.72 r180 bottom locked
R164 "ERJ-2RKF1002X" RESC1005X40X25NL05T05 138.8,144.925 r180 bottom locked
R165 "ERJ-2RKF1002X" RESC1005X40X25NL05T05 144.2,145.225 r0 bottom locked
R166 "ERJ-2GE0R00X" RESC1005X40X25ML05T05 145.11,142.22 r0 bottom locked
R167 "CRCW040222K6FKED" RESC1005X40X25LL05T05 141.9,140.625 r90 bottom locked
R168 "ERJ-2RKF1002X" RESC1005X40X25NL05T05 146.51,143.92 r0 bottom locked
R169 "ERJ-2RKF4751X" RESC1005X40X25ML05T05 141.2,150.125 r180 bottom locked
R170 "CRCW040222K6FKED" RESC1005X40X25LL05T05 142.7,142.425 r0 bottom locked
R171 "CRCW040222K6FKED" RESC1005X40X25LL05T05 142,144.5 r90 bottom locked
R172 "ERJ-2RKF4751X" RESC1005X40X25ML05T05 159.334,75.45 r90 top
R173 "ERJ-2GE0R00X" RESC1005X40X25ML05T05 167.534,70.95 r0 top
R174 "ERJ-2RKF8062X" RESC1005X40X25ML05T05 166.634,72.85 r270 top
R175 "ERJ-2RKF1002X" RESC1005X40X25NL05T05 165.634,72.65 r270 top
R176 "ERJ-2RKF1003X" RESC1005X40X25LL05T05 161.134,74.85 r180 top
R177 "ERJ-2RKF1432X" RESC1005X40X25LL05T05 164.734,72.75 r90 top
R178 "ERJ-2GEJ561x" RESC1005X40X25ML05T05 160.334,78.55 r180 top
R179 "ERJ-2RKF4992X" RESC1005X40X25LL05T05 161.134,73.25 r90 top
R180 "ERJ-2RKF1002X" RESC1005X40X25NL05T05 162.034,73.15 r90 top
R181 "CRCW040230K1FKED" RESC1005X40X25LL05T05 169.434,72.75 r90 top
R182 "ERJ-2RKF6812X" RESC1005X40X25LL05T05 168.534,72.75 r90 top
R183 "ERJ-6RQF4R7V" RESC2013X70X40LL20T20 170.034,70.85 r0 top
R184 "ERJ-2GEJ241x" RESC1005X40X25ML05T05 83.2,69.6 r270 bottom locked
R185 "ERJ-2GEJ241x" RESC1005X40X25ML05T05 86.55,84.225 r90 bottom locked
R186 "ERJ-2GEJ241x" RESC1005X40X25ML05T05 83.6,84.8 r90 bottom locked
R187 "ERJ-2GEJ241x" RESC1005X40X25ML05T05 76.5,69.95 r180 bottom locked
R188 "ERJ-2GEJ241x" RESC1005X40X25ML05T05 76.45,70.875 r0 bottom locked
R189 "ERJ-2GEJ241x" RESC1005X40X25ML05T05 71.475,72.8 r180 bottom locked
R190 "ERJ-2GEJ241x" RESC1005X40X25ML05T05 72.35,76.325 r270 bottom locked
R191 "ERJ-2GEJ241x" RESC1005X40X25ML05T05 71.025,80.225 r180 bottom locked
R192 "ERJ-2GEJ241x" RESC1005X40X25ML05T05 72.175,82.525 r90 bottom locked
R193 "ERJ-2GEJ241x" RESC1005X40X25ML05T05 73.425,84.3 r180 bottom locked
R194 "ERJ-2GEJ241x" RESC1005X40X25ML05T05 77.1,87.25 r270 bottom locked
R195 "ERJ-2GEJ241x" RESC1005X40X25ML05T05 79.95,69.7 r0 bottom locked
R196 "ERJ-2GEJ241x" RESC1005X40X25ML05T05 85.9,70.675 r90 bottom locked
R197 "ERJ-2GEJ241x" RESC1005X40X25ML05T05 84,70.275 r90 bottom locked
R198 "ERJ-2GEJ241x" RESC1005X40X25ML05T05 85.325,85.525 r270 bottom locked
R199 "ERJ-2GEJ241x" RESC1005X40X25ML05T05 76.5,69.15 r0 bottom locked
R200 "ERJ-2GEJ241x" RESC1005X40X25ML05T05 73.55,71.1 r0 bottom locked
R201 "ERJ-2GEJ241x" RESC1005X40X25ML05T05 71.5,72.05 r0 bottom locked
R202 "ERJ-2GEJ241x" RESC1005X40X25ML05T05 70.5,79.1 r0 bottom locked
R203 "ERJ-2GEJ241x" RESC1005X40X25ML05T05 71.025,81.025 r0 bottom locked
R204 "ERJ-2GEJ241x" RESC1005X40X25ML05T05 71.4,82.525 r270 bottom locked
R205 "ERJ-2GEJ241x" RESC1005X40X25ML05T05 73.425,85.225 r0 bottom locked
R206 "ERJ-2GEJ241x" RESC1005X40X25ML05T05 76.325,87.225 r270 bottom locked
R207 "ERJ-2RKF1003X" RESC1005X40X25LL05T05 73.6,106.5 r0 bottom locked
R208 "ERJ-2RKF2400X" RESC1005X40X25NL05T05 114.953,76.759 r180 top
R209 "ERJ-2RKF2400X" RESC1005X40X25NL05T05 115.341,64.211 r180 top
R210 "ERJ-2RKF2001X" RESC1005X40X25NL05T05 123.06,54.17 r0 bottom
R211 "RC0402JR-0739RL" RESC1005X40X25NL5T10 123.4,58.1 r180 bottom locked
R212 "RC0402JR-0739RL" RESC1005X40X25NL5T10 123.1,59.1 r180 bottom locked
R213 "RC0402JR-0739RL" RESC1005X40X25NL5T10 124.2,57.3 r180 bottom locked
R214 "RC0402JR-0739RL" RESC1005X40X25NL5T10 121.8,58.6 r90 bottom locked
R215 "RC0402JR-0739RL" RESC1005X40X25NL5T10 121.5,56.8 r0 bottom locked
R216 "RC0402JR-0739RL" RESC1005X40X25NL5T10 122,61.8 r270 bottom locked
R217 "RC0402JR-0739RL" RESC1005X40X25NL5T10 121.87,53.75 r90 bottom
R218 "RC0402JR-0739RL" RESC1005X40X25NL5T10 124.75,61.3 r180 bottom locked
R219 "RC0402JR-0739RL" RESC1005X40X25NL5T10 124.4,55.1 r180 bottom locked
R220 "RC0402JR-0739RL" RESC1005X40X25NL5T10 124.75,59.7 r180 bottom locked
R221 "ERJ-2RKF2400X" RESC1005X40X25NL05T05 116.9,53.7 r270 bottom locked
R222 "RC0402JR-0739RL" RESC1005X40X25NL5T10 120.3,58.2 r0 bottom locked
R223 "ERJ-2RKF2400X" RESC1005X40X25NL05T05 120.38,53.17 r90 bottom
R224 "RC0402JR-0739RL" RESC1005X40X25NL5T10 125.7,55.8 r180 bottom locked
R225 "RC0402JR-0739RL" RESC1005X40X25NL5T10 120.3,59 r0 bottom locked
R226 "RC0402JR-0739RL" RESC1005X40X25NL5T10 125.7,60.5 r180 bottom locked
R227 "RC0402JR-0739RL" RESC1005X40X25NL5T10 28.8,89.1 r0 bottom locked
R228 "RC0402JR-0739RL" RESC1005X40X25NL5T10 30.8,90.4 r270 bottom locked
R229 "RC0402JR-0739RL" RESC1005X40X25NL5T10 31.7,114.6 r270 bottom locked
R230 "RC0402JR-0739RL" RESC1005X40X25NL5T10 30.5,114.2 r0 bottom locked
R231 "RC0402JR-0739RL" RESC1005X40X25NL5T10 38.6,74.1 r180 bottom locked
R232 "NRC04F49R9TRF" RESC1005X35X25NL8T10 16.7,89.9 r0 bottom locked
R233 "NRC04F49R9TRF" RESC1005X35X25NL8T10 18.071,89.475 r90 bottom locked
R234 "NRC04F49R9TRF" RESC1005X35X25NL8T10 17.2,113 r90 bottom locked
R235 "NRC04F49R9TRF" RESC1005X35X25NL8T10 18.07,113 r90 bottom locked
R236 "RC0402JR-0739RL" RESC1005X40X25NL5T10 26.525,74.1 r0 bottom locked
R237 "RC0402JR-0739RL" RESC1005X40X25NL5T10 68.625,67.675 r0 bottom locked
R238 "RC0402JR-0739RL" RESC1005X40X25NL5T10 29.901,81.75 r90 bottom locked
R239 "RC0402JR-0739RL" RESC1005X40X25NL5T10 39.1,81.5 r90 bottom locked
R240 "RC0402JR-0739RL" RESC1005X40X25NL5T10 27.2,81.5 r90 bottom locked
R241 "RC0402JR-0739RL" RESC1005X40X25NL5T10 18.9,81.7 r90 bottom locked
R242 "ERJ-2RKF1003X" RESC1005X40X25LL05T05 110.25,8.8 r90 bottom locked
R243 "ERJ-2RKF2803X" RESC1005X40X25LL05T05 111.15,8.8 r90 bottom locked
R244 "ERJ-2RKF1003X" RESC1005X40X25LL05T05 111.65,14.9 r270 top
R245 "ERJ-2GE0R00X" RESC1005X40X25ML05T05 110.65,14.9 r270 top
R246 "ERJ-2RKF1004X" RESC1005X40X25LL05T05 113.45,14.9 r270 top
R247 "ERJ-2RKF1004X" RESC1005X40X25LL05T05 112.55,14.9 r270 top
R248 "ERJ-2RKF1004X" RESC1005X40X25LL05T05 121.05,3.1 r0 bottom locked
R249 "NRC04F49R9TRF" RESC1005X35X25NL8T10 47,16.5 r90 bottom locked
R250 "NRC04F49R9TRF" RESC1005X35X25NL8T10 45.7,18.5 r0 bottom locked
R251 "NRC04F49R9TRF" RESC1005X35X25NL8T10 43.1,18.6 r180 bottom locked
R252 "NRC04F49R9TRF" RESC1005X35X25NL8T10 42,16.7 r90 bottom locked
R253 "NRC04F49R9TRF" RESC1005X35X25NL8T10 43.3,13.5 r180 bottom locked
R254 "NRC04F49R9TRF" RESC1005X35X25NL8T10 40.7,15.5 r270 bottom locked
R255 "NRC04F49R9TRF" RESC1005X35X25NL8T10 38.2,13.5 r180 bottom locked
R256 "NRC04F49R9TRF" RESC1005X35X25NL8T10 37.7,15.9 r180 bottom locked
R257 "ERJ-2GE0R00X" RESC1005X40X25ML05T05 38.3,27.7 r0 top
R258 "ERJ-2GE0R00X" RESC1005X40X25ML05T05 38.3,25.4 r0 top
R259 "ERJ-2RKF4701X" RESC1005X40X25LL05T05 38.4,22.4 r180 top
R260 "NRC04F49R9TRF" RESC1005X35X25NL8T10 38.2,23.225 r180 top
R261 "ERJ-2RKF4701X" RESC1005X40X25LL05T05 38.325,24.1 r180 top
R262 "ERJ-2RKF1002X" RESC1005X40X25NL05T05 51.5,20.2 r0 top
R263 "ERJ-2RKF4701X" RESC1005X40X25LL05T05 40.5,21.6 r180 top
R264 "ERJ-2RKF4701X" RESC1005X40X25LL05T05 47.1,21.6 r270 top
R265 "ERJ-2RKF4991X" RESC1005X40X25NL05T05 42,23.6 r90 bottom locked
R266 "ERJ-2RKF2400X" RESC1005X40X25NL05T05 50.2,29.4 r180 top
R267 "ERJ-2RKF2400X" RESC1005X40X25NL05T05 50.2,30.7 r180 top
R268 "ERJ-2RKF2400X" RESC1005X40X25NL05T05 50.2,32 r180 top
R269 "ERJ-2RKF2400X" RESC1005X40X25NL05T05 50.2,33.3 r180 top
R270 "ERJ-2RKF1502X" RESC1005X40X25ML05T05 37.9,34.4 r90 top
R271 "ERJ-2RKF2400X" RESC1005X40X25NL05T05 50.2,34.6 r180 top
R272 "ERJ-2RKF1002X" RESC1005X40X25NL05T05 38.2,32.9 r180 top
R273 "NRC04F49R9TRF" RESC1005X35X25NL8T10 70.45,16.5 r90 bottom locked
R274 "NRC04F49R9TRF" RESC1005X35X25NL8T10 69.15,18.5 r0 bottom locked
R275 "NRC04F49R9TRF" RESC1005X35X25NL8T10 66.55,18.6 r180 bottom locked
R276 "NRC04F49R9TRF" RESC1005X35X25NL8T10 65.45,16.7 r90 bottom locked
R277 "NRC04F49R9TRF" RESC1005X35X25NL8T10 66.75,13.5 r180 bottom locked
R278 "NRC04F49R9TRF" RESC1005X35X25NL8T10 64.15,15.5 r270 bottom locked
R279 "NRC04F49R9TRF" RESC1005X35X25NL8T10 61.65,13.5 r180 bottom locked
R280 "NRC04F49R9TRF" RESC1005X35X25NL8T10 61.15,15.9 r180 bottom locked
R281 "ERJ-2GE0R00X" RESC1005X40X25ML05T05 61.75,27.7 r0 top
R282 "ERJ-2GE0R00X" RESC1005X40X25ML05T05 61.75,25.4 r0 top
R283 "ERJ-2RKF4701X" RESC1005X40X25LL05T05 61.85,22.4 r180 top
R284 "NRC04F49R9TRF" RESC1005X35X25NL8T10 61.675,23.225 r180 top
R285 "ERJ-2RKF4701X" RESC1005X40X25LL05T05 61.775,24.1 r180 top
R286 "ERJ-2RKF1002X" RESC1005X40X25NL05T05 74.95,20.2 r0 top
R287 "ERJ-2RKF4701X" RESC1005X40X25LL05T05 63.95,21.6 r180 top
R288 "ERJ-2RKF4701X" RESC1005X40X25LL05T05 70.55,21.6 r270 top
R289 "ERJ-2RKF4991X" RESC1005X40X25NL05T05 65.4,23.1 r90 bottom locked
R290 "ERJ-2RKF2400X" RESC1005X40X25NL05T05 73.65,29.4 r180 top
R291 "ERJ-2RKF2400X" RESC1005X40X25NL05T05 73.65,30.7 r180 top
R292 "ERJ-2RKF2400X" RESC1005X40X25NL05T05 73.65,32 r180 top
R293 "ERJ-2RKF1502X" RESC1005X40X25ML05T05 61.45,34.5 r90 top
R294 "ERJ-2RKF2400X" RESC1005X40X25NL05T05 73.65,33.3 r180 top
R295 "ERJ-2RKF1002X" RESC1005X40X25NL05T05 61.75,33 r180 top
R296 "ERJ-2RKF2400X" RESC1005X40X25NL05T05 73.65,34.6 r180 top
R297 "ERJ-2GEJ221X" RESC1005X40X25LL05T05 26.787,1.825 r0 bottom locked
R298 "ERJ-2GEJ221X" RESC1005X40X25LL05T05 15.387,4.225 r180 bottom locked
R299 "CRCW040212K1FKED" RESC1005X40X25LL05T05 17.187,26.925 r270 top
R300 "NRC04F49R9TRF" RESC1005X35X25NL8T10 16.3,33.65 r180 top
R301 "NRC04F49R9TRF" RESC1005X35X25NL8T10 16.45,30.35 r180 top
R302 "ERJ-2RKF4701X" RESC1005X40X25LL05T05 17.9,35.95 r90 top
R303 "ERJ-2RKF4701X" RESC1005X40X25LL05T05 23.7,35.95 r270 top
R304 "ERJ-2RKF4701X" RESC1005X40X25LL05T05 27.4,29.25 r0 top
R305 "ERJ-2RKF4701X" RESC1005X40X25LL05T05 16.3,32.75 r180 top
R306 "ERJ-2RKF4701X" RESC1005X40X25LL05T05 22.9,35.95 r270 top
R307 "ERJ-2RKF4701X" RESC1005X40X25LL05T05 27.4,27.75 r0 top
R308 "ERJ-2RKF4701X" RESC1005X40X25LL05T05 21.6,35.95 r270 top
R309 "ERJ-2RKF4701X" RESC1005X40X25LL05T05 20,35.95 r90 top
R310 "ERJ-2RKF4701X" RESC1005X40X25LL05T05 20.8,35.95 r270 top
R311 "ERJ-2RKF1002X" RESC1005X40X25NL05T05 11.887,28.025 r270 top
R312 "ERJ-2RKF4701X" RESC1005X40X25LL05T05 18.7,35.95 r270 top
R313 "ERJ-2RKF4701X" RESC1005X40X25LL05T05 16.4,31.25 r0 top
R314 "ERJ-2RKF2001X" RESC1005X40X25NL05T05 10.887,32.925 r270 top
R315 "ERJ-2RKF1001X" RESC1005X40X25LL05T05 9.487,33.425 r0 top
R316 "ERJ-2RKF1002X" RESC1005X40X25NL05T05 8.687,34.825 r270 top
R317 "ERJ-2RKF1001X" RESC1005X40X25LL05T05 119.3,21.9 r90 top
R318 "ERJ-2RKF1001X" RESC1005X40X25LL05T05 120.6,21.9 r90 top
R319 "ERJ-2RKF1001X" RESC1005X40X25LL05T05 121.9,21.9 r90 top
R320 "ERJ-2RKF1002X" RESC1005X40X25NL05T05 68.1,43 r0 bottom locked
R321 "ERJ-2RKF1002X" RESC1005X40X25NL05T05 65.1,43.6 r0 bottom locked
R322 "ERJ-2RKF1002X" RESC1005X40X25NL05T05 68.1,42.1 r180 bottom locked
R323 "ERJ-2GE0R00X" RESC1005X40X25ML05T05 77.3,53.2 r90 top
R324 "ERJ-2RKF1002X" RESC1005X40X25NL05T05 73.8,55.275 r90 top
R325 "ERJ-2RKF1002X" RESC1005X40X25NL05T05 76.3,53.2 r90 top
R326 "ERJ-2GE0R00X" RESC1005X40X25ML05T05 78.925,85.975 r270 bottom locked
R327 "ERJ-2GE0R00X" RESC1005X40X25ML05T05 76.525,83.8 r0 bottom locked
R328 "ERJ-2RKF1001X" RESC1005X40X25LL05T05 105.325,21.725 r180 top
R329 "ERJ-2RKF1001X" RESC1005X40X25LL05T05 105.26,32.625 r0 top
R330 "ERJ-2RKF1001X" RESC1005X40X25LL05T05 114.66,22.625 r180 top
R331 "ERJ-2RKF1001X" RESC1005X40X25LL05T05 109.56,22.625 r180 top
R332 "ERJ-2RKF4701X" RESC1005X40X25LL05T05 100.2,146.8 r180 bottom locked
R333 "ERJ-2RKF4701X" RESC1005X40X25LL05T05 65.3,126.05 r90 bottom locked
R334 "ERJ-2RKF4701X" RESC1005X40X25LL05T05 51.1,128.55 r270 bottom locked
R335 "ERJ-2GE0R00X" RESC1005X40X25ML05T05 101.4,138.2 r90 top
R336 "ERJ-2GE0R00X" RESC1005X40X25ML05T05 100.55,138.2 r90 top
R337 "ERJ-2GE0R00X" RESC1005X40X25ML05T05 99.45,138.2 r90 top
R338 "ERJ-2GE0R00X" RESC1005X40X25ML05T05 98.6,138.2 r90 top
R339 "ERJ-2RKF1001X" RESC1005X40X25LL05T05 62.5,140.1 r180 top
R340 "ERJ-2RKF1001X" RESC1005X40X25LL05T05 50.9,142.5 r270 top
R341 "ERJ-2RKF1001X" RESC1005X40X25LL05T05 50.7,145.3 r90 top
R342 "ERJ-2RKF1651X" RESC1005X40X25LL05T05 89.475,18.8 r270 top
R343 "ERJ-2RKF1002X" RESC1005X40X25NL05T05 83.9,22.725 r0 top
SW1 "EG2207" ESWI-EG2207_V 170.8,141.7 r90 top locked
SW2 "416131160804" 416131160804 121.235,27.61 r180 top
U1 "10AS066N3F40E2SGE2" ALTR-FBGA1517_A-350 82.194,76.939 r0 top locked
U2 "EN6360QI" ALTR-QFN-68_A-305_V 10.4,103.01 r180 bottom locked
U3 "EN63A0QI" ALTR-QFN-76_A-305_V 122.365,124.645 r270 top locked
U4 "EN6360QI" ALTR-QFN-68_A-305_V 10.75,60.6 r180 bottom locked
U5 "EN6360QI" ALTR-QFN-68_A-305_V 165.285,60.556 r90 bottom locked
U6 "EN6337QI" ALTR-QFN-38_A-190_D1-193_V 9.325,82.75 r90 bottom locked
U7 "EN63A0QI" ALTR-QFN-76_A-305_V 147.545,120.95 r270 top locked
U8 "EN6337QI" ALTR-QFN-38_A-190_D1-193_V 122.45,138.5 r270 top locked
U9 "TPS3700DDCR" DDC0006A_M 152.545,104.05 r90 top
U10 "LTM4677IY#PBF" LT-BGA-144-05-08-1920_V 146.44,79.195 r0 top
U11 "KSZ9031RNXCA" MICL-QFN-48_V 21.612,30.375 r90 top locked
U12 "EN2342QI" ALTR-QFN-68_A-305_D1-210_V 168.384,78.95 r180 top
U13 "LT1389ACS8-1.25" LT-S8-8_M 74.05,111.025 r270 bottom locked
U14 "MT40A512M16LY-107E" MICT-LY-96_A 118,71.3 r90 top
U15 "MT40A512M16LY-107E" MICT-LY-96_A 118,58.6 r90 top
U16 "MAX14523AATA+" MAXM-T833+2_V 110.875,5.975 r270 bottom locked
U17 "88E1111-B2-NDC2C000" MARV-NDC96 44.1,27.1 r0 top locked
U18 "SG-310SDF 25.0000M-B3" EPSON-SG-310-4_V 50.9,23 r90 top
U19 "LTC3025EDC-1#PBF" LT-DC6-6_V 40,34.5 r180 top
U20 "88E1111-B2-NDC2C000" MARV-NDC96 67.55,27.1 r0 top locked
U21 "SG-310SDF 25.0000M-B3" EPSON-SG-310-4_V 74.35,23 r90 top
U22 "LTC3025EDC-1#PBF" LT-DC6-6_V 63.45,34.5 r180 top
U23 "LTM4676IY#PBF" LT-BGA-144-05-08-1920_V 141.4,144.3 r90 top locked
U24 "SG-310SDF 25.0000M-B3" EPSON-SG-310-4_V 14.387,27.925 r0 top
U25 "LTC3026EDD-1#PBF" LT-DD-10_V 10.887,35.825 r270 top locked
U26 "EPCQL1024F24IN" ALTR-FBGA24_A-130 65.475,44.4 r180 top
U27 "Si5338B-B03799-GM" SLAB-QFN-24-2550x2550TP_V 62.45,127.4 r90 top locked
U28 "Si5338B-B03799-GM" SLAB-QFN-24-2550x2550TP_V 54.25,126.65 r270 top locked
U29 "Si52112-A1-GM2" SLAB-TDFN-10_L 99.8,134.615 r90 top locked
U30 "Si5338C-B03798-GM" SLAB-QFN-24-2550x2550TP_V 61.495,137.15 r180 top locked
U31 "ICS83054AGILF" IDT-TSSOP-16_M 54.12,145.176 r270 top
U32 "516FHA000132AAG" SLAB-DFN-6-5000X7000DE_A_V 88.71,109.1 r90 top
U33 "FT601Q" FTDI-QFN-76_M 90.3,24.8 r0 top locked
X1 "ASE2-33.000MHZ-ET" ABRA-ASE2_V 85.2,16.6 r0 top
Y1 "FA-128 25.0000MB-C" EPSON-FA-128_V 60.8,123.4 r0 top
Y2 "FA-128 25.0000MB-C" EPSON-FA-128_V 55.22,131 r180 top
Y3 "FA-128 25.0000MB-C" EPSON-FA-128_V 99.7,131.1 r180 top
Y4 "FA-128 25.0000MB-C" EPSON-FA-128_V 65.345,135.575 r90 top
Y5 "ASE2-33.000MHZ-ET" ABRA-ASE2_V 49.5,148.4 r0 top

## Footprints (in the part's own frame and the unit in brackets; to place one, negate y for a bottom-side part, rotate by r counter-clockwise, add the part's x,y. Pads: shape width x height; smd on the part's side, far side on the other; paste and mask are expansions set on the pad)
0603_A [mm] "Chip LED, 2-Leads, Body 1.6x0.8mm, IPC Medium Density"
  rect 0.8x0.8 smd: 1(-0.8,0) 2(0.8,0)
  silkscreen extent -1.5,-0.3 -1.5,0.3, body extent -0.8,-0.4 0.8,0.4, height 0.7
416131160804 [mm] "04p, 1.27mm Pitch, Horizontal, HP Type, SMT, flat Actuator, black, with Tape, T&R"
  rect 0.76x1.27 smd: 1(-1.905,-3.81) 2(-0.635,-3.81) 3(0.635,-3.81) 4(1.905,-3.81) 5(1.905,3.81) 6(0.635,3.81) 7(-0.635,3.81) 8(-1.905,3.81)
  silkscreen extent -3.11,-3.66 3.06,2.8, body extent -3.06,-4 3.06,4, height 2.06
ABRA-ASE2_V [mm] "SMD, 4-Leads, Body 3.2x2.5mm, Pitch 2.1mm"
  rect 1.2x1 smd: 1(-1.05,-0.825) 2(1.05,-0.825) 3(1.05,0.825) 4(-1.05,0.825)
  silkscreen extent -2.1,-1.25 0.05,1.25, body extent -1.6,-1.25 1.6,1.25, height 1.2
ALTR-FBGA24_A-130 [mm] "BGA, 24-Balls, Body 8x6mm, Pitch 1mm"
  round 0.35 smd: A2(-1,2) A3(0,2) A4(1,2) A5(2,2) B1(-2,1) B2(-1,1) B3(0,1) B4(1,1) B5(2,1) C1(-2,0) C2(-1,0) C3(0,0) C4(1,0) C5(2,0) D1(-2,-1) D2(-1,-1) D3(0,-1) D4(1,-1) D5(2,-1) E1(-2,-2) E2(-1,-2) E3(0,-2) E4(1,-2) E5(2,-2)
  silkscreen extent -3.78,-4 3,4, body extent -3,-4 3,4, height 1.3